# Altium PCB IOT_Speaker-PCB-v1.3.PcbDoc (part 2 of 3)
Units mm, origin at the board's own origin, x right, y up, seen from the top; angles counter-clockwise.
Board outline 61.96 x 67.79 mm, 2 copper layers (Top Layer, Bottom Layer), stack 1.57 mm thick; 111 components, 61 nets, 362 pads, 148 vias.
Unrouted connection lines stored in the file: 20.
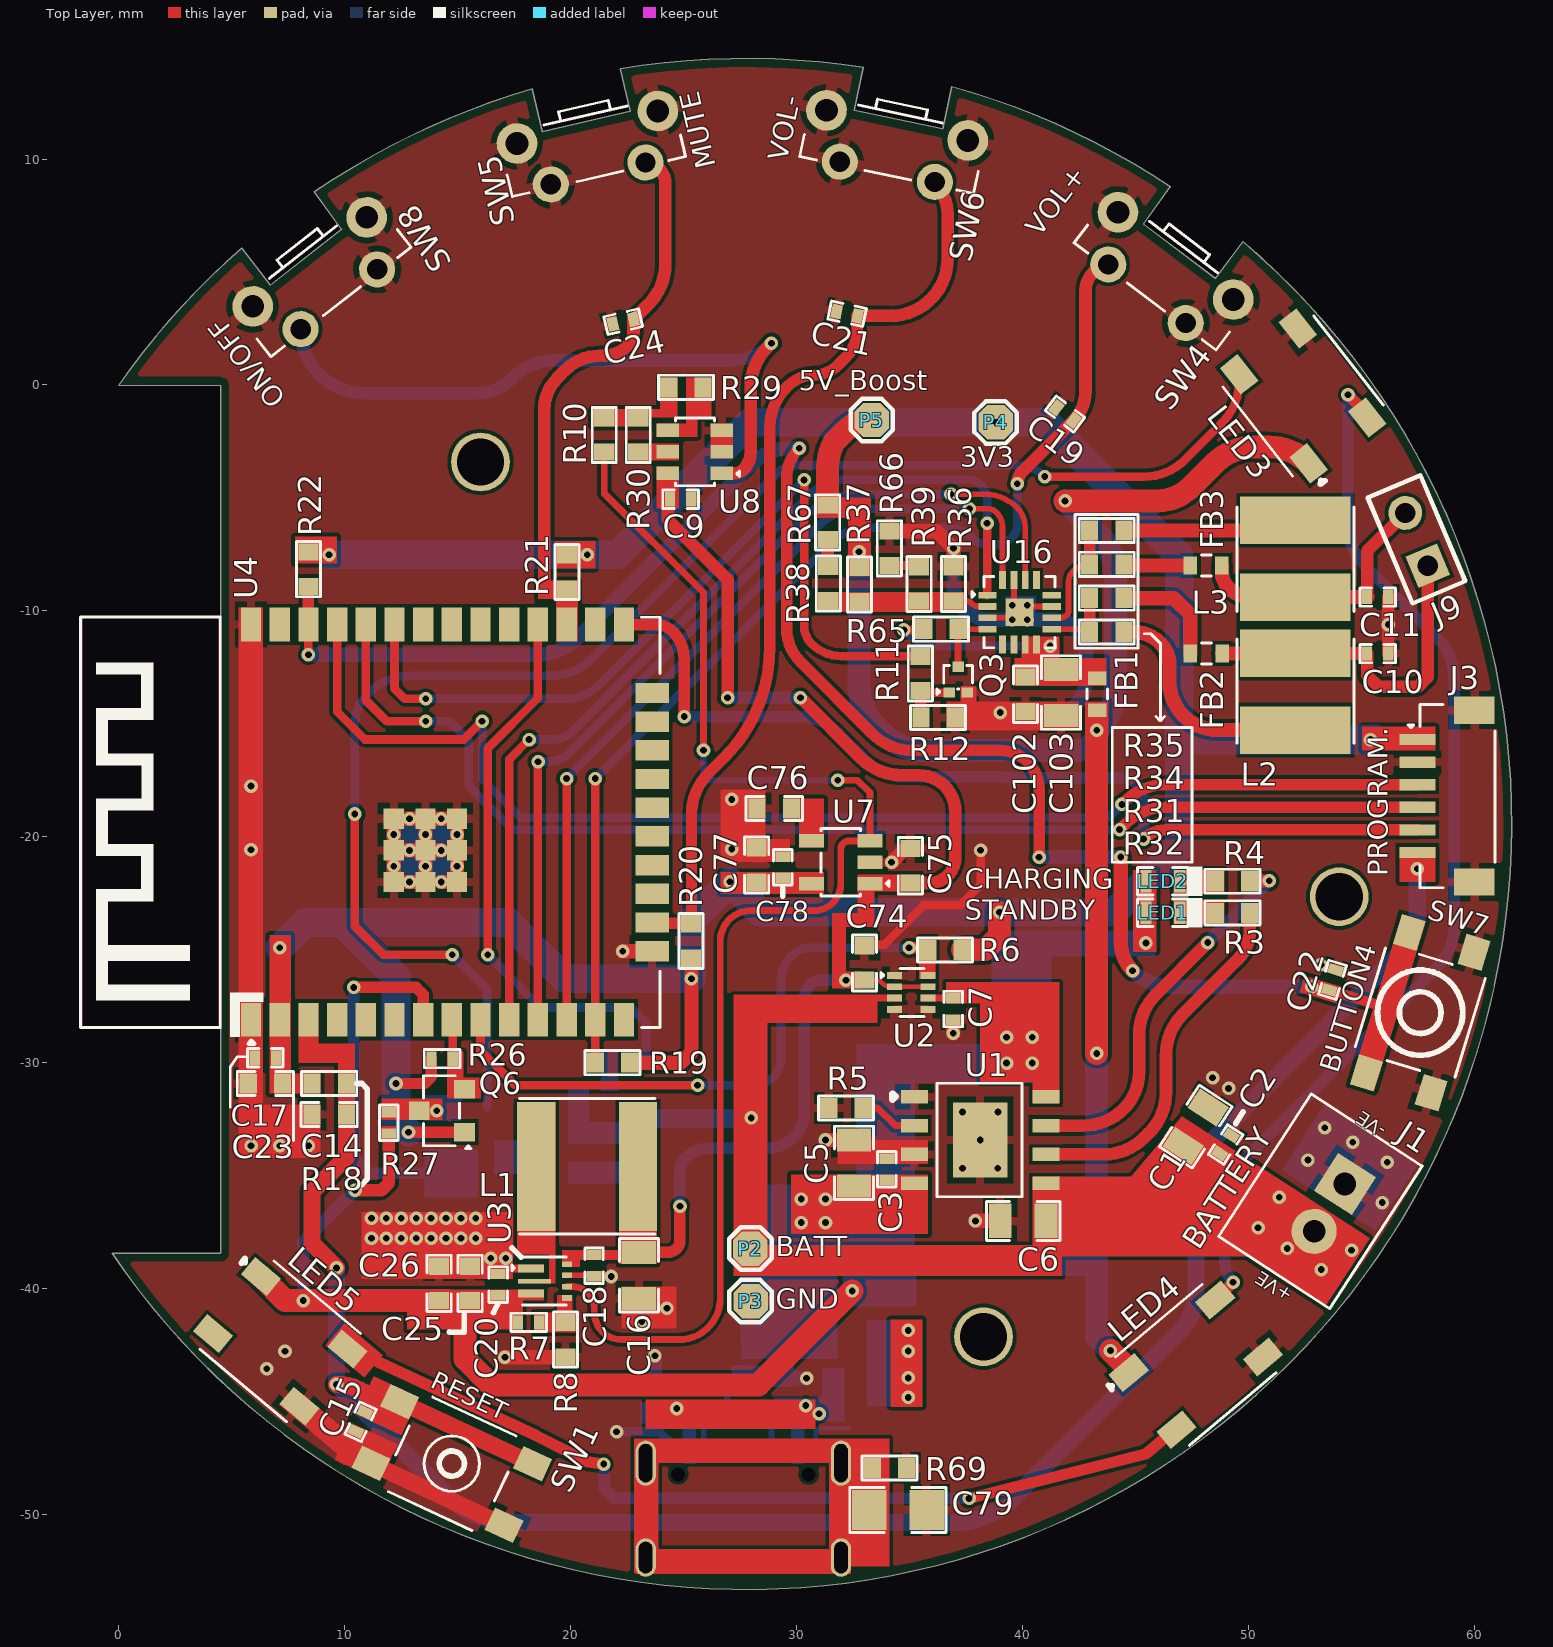
[diagram p0: Top Layer view]

## Part data (continued)
R3: library part RC0603FR-07220RL, "RES SMD 220 OHM 1% 1/10W 0603", Case Code (Imperial)=0603, Case Code (Metric)=1608, LCSC Part Number=C107696, Manufacturer=Yageo, Max Operating Temperature=155°C, Max Power Dissipation=100mW, Min Operating Temperature=-55°C, Package Quantity=1, Resistance=220R, Supplier Part Number 1=311-220HRCT-ND, Temperature Coefficient=100ppm/°C, Tolerance=1%, Voltage Rating=50V, Case/Package=0603, ComponentLink1Description=http://www.yageo.com/documents/recent/PYu-RC_Group_51_RoHS_L_10.pdf?src-supplier=Digi-Key, ComponentLink1URL=http://www.yageo.com/documents/recent/PYu-RC_Group_51_RoHS_L_10.pdf?src-supplier=Digi-Key, ComponentLink2Description=http://www.farnell.com/datasheets/1868787.pdf?src-supplier=Element14, ComponentLink2URL=http://www.farnell.com/datasheets/1868787.pdf?src-supplier=Element14, Composition="Thick Film", Depth=0.8mm, Features="Moisture Resistant", Height=0.022inch, Item Type=Resistor, Lead Free="Lead Free", Length=1.6mm, Manufacturer Part Number=RC0603FR-07220RL, Military Standard=Not, Number of Pins=2, Number of Terminations=2, Packaging="Tape and Reel", Power Rating=100mW, Pricing 1="1=0.1, 10=0.023, 100=0.0094, 1000=0.00421, 2500=0.00366 (USD)", REACH SVHC="No SVHC", Stock 1=5843995, Supplier 1=Digi-Key, Termination=SMD/SMT, Voltage Rating (DC)=50V, Width=0.031inch
R4: library part RC0603JR-07330RL, "RES  SMD 330R 100 mW 0603", Case Code (Imperial)=0603, Case Code (Metric)=1608, LCSC Part Number=C105879, Manufacturer=Yageo, Max Operating Temperature=155°C, Max Power Dissipation=100mW, Min Operating Temperature=-55°C, Package Quantity=5000, Resistance Tolerance=5%, Resistor Type="Thick Film", Supplier Part Number 1=311-330GRCT-ND, Temperature Coefficient=100ppm/°C, Voltage Rating=50V, Case/Package=0603, Category="Chip SMD Resistors", Construction=Rectangular, Depth=0.8mm, Features="Moisture Resistant", Height=0.45mm, Item Type=Resistor, Lead Free="Lead Free", Length=1.6mm, Manufacturer Part Number=RC0603JR-07330RL, Military Standard=Not, Number of Pins=2, Number of Terminations=2, Packaging="Tape and Reel", Power Rating=100mW, Pricing 1="1=0.10000, 10=0.02000, 100=0.00800, 1000=0.00360, 2500=0.00312 (USD)", REACH SVHC="No SVHC", Resistance=330R, RoHS=Yes, RoHS Compliant=Yes, Series=RC, Size Code=0603, Stock 1=1074593, Supplier 1=Digi-Key, Termination=SMD/SMT, Tolerance=5%, Voltage Rating (DC)=50V, Width=0.8mm
R5: library part 0603WAF1201T5E, "Thick Film Resistors 75V 1.2kΩ 0603 Chip Resistor - Surface Mount ROHS", LCSC Part Number=C22765, Manufacturer=UNI-ROYAL, ComponentLink1Description=LCSC, ComponentLink1URL=https://lcsc.com/product-detail/Chip-Resistor-Surface-Mount_UNI-ROYAL-Uniroyal-Elec-0603WAF1201T5E_C22765.html, Footpint=0603, Item Type=Resistor, Manufacturer Part Number=0603WAF1201T5E
R6 R18 R19 R20 R21 R22: library part RC0603FR-0710KL, "RES SMD 10K Ohm 1% 1/10W 0603", Case Code (Imperial)=0603, Case Code (Metric)=1608, LCSC Part Number=C98220, Manufacturer=Yageo, Max Operating Temperature=155°C, Max Power Dissipation=100mW, Min Operating Temperature=-55°C, Resistance=10kR, Resistance Tolerance=1%, Resistor Type="Thick Film", Supplier Part Number 1=311-10.0KHRCT-ND, Temperature Coefficient=100ppm/°C, Voltage Rating=75V, Voltage Rating (DC)=50V, Case/Package=0603, Category="Chip SMD Resistors", ComponentLink1Description=https://datasheet.ciiva.com/7660/38590-7660789.pdf?src-supplier=Element14, ComponentLink1URL=https://datasheet.ciiva.com/7660/38590-7660789.pdf?src-supplier=Element14, ComponentLink2Description=https://datasheet.ciiva.com/7983/443971-7983596.pdf?src-supplier=Element14, ComponentLink2URL=https://datasheet.ciiva.com/7983/443971-7983596.pdf?src-supplier=Element14, ComponentLink3Description=https://datasheet.ciiva.com/22747/443971-22747519.pdf?src-supplier=Element14, ComponentLink3URL=https://datasheet.ciiva.com/22747/443971-22747519.pdf?src-supplier=Element14, ComponentLink4Description=https://datasheet.ciiva.com/46440/1868787-46440891.pdf?src-supplier=Element14, ComponentLink4URL=https://datasheet.ciiva.com/46440/1868787-46440891.pdf?src-supplier=Element14, ComponentLink5Description=https://datasheet.ciiva.com/7746/1738695-7746239.pdf?src-supplier=Element14, ComponentLink5URL=https://datasheet.ciiva.com/7746/1738695-7746239.pdf?src-supplier=Element14, ComponentLink6Description=https://datasheet.ciiva.com/15189/getdatasheetpartid-409289-15189591.pdf?src-supplier=Verical, ComponentLink6URL=https://datasheet.ciiva.com/15189/getdatasheetpartid-409289-15189591.pdf?src-supplier=Verical, Construction=Rectangular, Depth=0.8mm, Features="Moisture Resistant", Height=0.45mm, Item Type=Resistor, Lead Free="Lead Free", Lead Pitch=0.3mm, Length=1.6mm, Manufacturer Part Number=RC0603FR-0710KL, Military Standard=Not, Number of Pins=2, Number of Terminations=2, Packaging="Tape and Reel", Power Rating=100mW, Pricing 1="1=0.10000, 10=0.02400, 100=0.00970, 1000=0.00436, 2500=0.00378 (USD)", REACH SVHC=Unknown, RoHS=Yes, RoHS Compliant=Yes, Series=RC, Size Code=0603, Stock 1=25249139, Supplier 1=Digi-Key, Termination=SMD/SMT, Tolerance=1%, Weight=7.1E-05oz, Width=0.8mm
R7: library part FRC0402F7323TS, "±1% 732kΩ 0402 Chip Resistor - Surface Mount ROHS", LCSC Part Number=C5159692, Manufacturer=FOJAN, Package=0402, ComponentLink1Description=LCSC, ComponentLink1URL=https://www.lcsc.com/product-detail/Chip-span-style-background-color-ff0-Resistor-span-Surface-Mount_FOJAN-FRC0402F7323TS_C5159692.html, Item Type=Resistor, Manufacturer Part Number=FRC0402F7323TS
R8 R66 R67: library part RT0603BRD07100KL, "RES SMD 100K OHM 0.1% 1/10W 0603", Case Code (Imperial)=0603, Case Code (Metric)=1608, LCSC Part Number=C122538, Manufacturer=Yageo, Max Operating Temperature=125°C, Max Power Dissipation=100mW, Min Operating Temperature=-55°C, Package Quantity=5000, Resistance=100kR, Supplier Part Number 1=YAG1235CT-ND, Temperature Coefficient=25ppm/°C, Tolerance=0.1%, Voltage Rating=75V, Case/Package=0603, ComponentLink1Description=http://documents.rs-components.com/techlib://itc_doclist_GB.htm?stockno=6174810&src-supplier=RSComponents, ComponentLink1URL=http://documents.rs-components.com/techlib://itc_doclist_GB.htm?stockno=6174810&src-supplier=RSComponents, Composition="Thin Film", Depth=0.8mm, Features="Moisture Resistant", Height=0.022inch, Item Type=Resistor, Lead Free="Lead Free", Length=1.6mm, Manufacturer Part Number=RT0603BRD07100KL, Military Standard=Not, Mount="Surface Mount", Number of Terminations=2, Packaging="Tape and Reel", Power Rating=100mW, Pricing 1="1=0.39, 10=0.332, 100=0.1298, 1000=0.05435, 2500=0.04982 (USD)", Stock 1=53395, Supplier 1=Digi-Key, Termination=SMD/SMT, Voltage Rating (DC)=75V, Width=0.031inch, Working Voltage=75V
R9 R12 R54: library part RC0603JR-0747KL, "RES 47K OHM 5% 1/10W 0603", Case Code (Imperial)=0603, Case Code (Metric)=1608, LCSC Part Number=C127447, Manufacturer=Yageo, Max Operating Temperature=155°C, Max Power Dissipation=100mW, Min Operating Temperature=-55°C, Package Quantity=5000, Resistance=47kR, Resistance Tolerance=1%, Resistor Type="Thick Film", Temperature Coefficient=100ppm/°C, Tolerance=5%, Voltage Rating=50V, Case/Package=0603, Category="Chip SMD Resistors", ComponentLink1Description=http://www.farnell.com/datasheets/443971.pdf, ComponentLink1URL=http://www.farnell.com/datasheets/443971.pdf, ComponentLink2Description=http://www.mouser.com/catalog/specsheets/RC0603.pdf, ComponentLink2URL=http://www.mouser.com/catalog/specsheets/RC0603.pdf, ComponentLink3Description=https://datasheet.ciiva.com/46395/443971-46395003.pdf?src-supplier=Element14, ComponentLink3URL=https://datasheet.ciiva.com/46395/443971-46395003.pdf?src-supplier=Element14, ComponentLink4Description=https://datasheet.ciiva.com/12558/rc0603-272842-12558744.pdf?src-supplier=Mouser, ComponentLink4URL=https://datasheet.ciiva.com/12558/rc0603-272842-12558744.pdf?src-supplier=Mouser, Composition="Thick Film", Construction=Rectangular, Depth=0.8mm, Features="Moisture Resistant", Height=0.45mm, Lead Free="Lead Free", Length=1.6mm, Manufacturer Part Number=RC0603JR-0747KL, Military Standard=Not, Number of Pins=2, Number of Terminations=2, Packaging="Tape and Reel", Power Rating=100mW, Pricing 1="5000=0.0025, 10000=0.0022, 25000=0.0019, 1=0.0011, 6000=0.001 (USD)", Pricing 2="1=0.10000, 10=0.02300, 100=0.00930, 1000=0.00417, 2500=0.00362 (USD)", REACH SVHC="No SVHC", RoHS=Yes, RoHS Compliant=Yes, Series=RC, Size Code=0603, Stock 1=599135, Stock 2=1087850, Supplier 1=Arrow, Supplier 2=Digi-Key, Supplier Part Number 1=RC0603JR-0747KL, Supplier Part Number 2=311-30.0KHRCT-ND, Termination=SMD/SMT, Voltage Rating (DC)=50V, Width=0.8mm
R10 R11 R56: library part RC0603JR-074K7L, "RES SMD 4.7K OHM 5% 1/10W 0603", Case Code (Imperial)=0603, Case Code (Metric)=1608, LCSC Part Number=C105428, Manufacturer=Yageo, Max Operating Temperature=155°C, Min Operating Temperature=-55°C, Power Rating=100mW, Resistance=4.7kR, Supplier Part Number 1=311-4.7KGRCT-ND, Temperature Coefficient=100ppm/°C, Tolerance=5%, Voltage Rating=50V, Case/Package=0603, ComponentLink1Description=http://www.farnell.com/datasheets/443971.pdf?src-supplier=Element14, ComponentLink1URL=http://www.farnell.com/datasheets/443971.pdf?src-supplier=Element14, Composition="Thick Film", Depth=0.8mm, Lead Free="Lead Free", Length=1.6mm, Manufacturer Part Number=RC0603JR-074K7L, Military Standard=Not, Number of Pins=2, Packaging="Tape and Reel", Pricing 1="1=0.1, 10=0.02, 100=0.0081, 1000=0.00362, 2500=0.00314 (USD)", REACH SVHC="No SVHC", Stock 1=19706643, Supplier 1=Digi-Key, Termination=SMD/SMT, Voltage Rating (DC)=50V, Width=0.8mm
  R10 R56: Item Type=Resistor
R26 R27: library part RC0402FR-0710KL, "RES 10K OHM 1% 1/16W 0402", Case Code (Imperial)=0402, Case Code (Metric)=1005, LCSC Part Number=C60490, Manufacturer=Yageo, Max Operating Temperature=155°C, Max Power Dissipation=63mW, Min Operating Temperature=-55°C, Power Rating=62.5mW, Resistance=10kR, Resistance Tolerance=1%, Resistor Type="Thick Film", Supplier Part Number 1=603-RC0402FR-0710KL, Temperature Coefficient=100ppm/°C, Voltage Rating=50V, Case/Package=0402, Category="Chip SMD Resistors", ComponentLink1Description=https://datasheet.ciiva.com/7660/38568-7660787.pdf?src-supplier=Element14, ComponentLink1URL=https://datasheet.ciiva.com/7660/38568-7660787.pdf?src-supplier=Element14, ComponentLink2Description=https://datasheet.ciiva.com/7849/1686128-7849814.pdf?src-supplier=Element14, ComponentLink2URL=https://datasheet.ciiva.com/7849/1686128-7849814.pdf?src-supplier=Element14, ComponentLink3Description=https://datasheet.ciiva.com/7983/1018594-7983486.pdf?src-supplier=Element14, ComponentLink3URL=https://datasheet.ciiva.com/7983/1018594-7983486.pdf?src-supplier=Element14, ComponentLink4Description=https://datasheet.ciiva.com/22747/1018594-22747512.pdf?src-supplier=Element14, ComponentLink4URL=https://datasheet.ciiva.com/22747/1018594-22747512.pdf?src-supplier=Element14, ComponentLink5Description=https://datasheet.ciiva.com/12667/pyu-rc0402-51-rohs-l-6-r-12667067.pdf?src-supplier=Mouser, ComponentLink5URL=https://datasheet.ciiva.com/12667/pyu-rc0402-51-rohs-l-6-r-12667067.pdf?src-supplier=Mouser, ComponentLink6Description=https://datasheet.ciiva.com/7849/1784430-7849813.pdf?src-supplier=Element14, ComponentLink6URL=https://datasheet.ciiva.com/7849/1784430-7849813.pdf?src-supplier=Element14, ComponentLink7Description=https://datasheet.ciiva.com/7849/1784430-7849815.pdf?src-supplier=Element14, ComponentLink7URL=https://datasheet.ciiva.com/7849/1784430-7849815.pdf?src-supplier=Element14, Construction=Rectangular, Depth=0.5mm, Features="Moisture Resistant", Height=0.32mm, Item Type=Resistor, Lead Free="Lead Free", Lead Pitch=0.2mm, Length=1mm, Manufacturer Part Number=RC0402FR-0710KL, Military Standard=Not, Number of Pins=2, Number of Terminations=2, Packaging="Tape and Reel", Pricing 1="1=0.10000, 10=0.01400, 50=0.01400, 100=0.00500, 1000=0.00300, 10000=0.00200 (USD)", REACH SVHC="No SVHC", RoHS=Yes, RoHS Compliant=Yes, Series=RC, Stock 1=18648329, Supplier 1=Mouser, Termination=SMD/SMT, Tolerance=1%, Voltage Rating (DC)=50V, Width=0.5mm, Working Voltage=50V
R28 R55: library part RC0603FR-071KL, "RES SMD 1K OHM 1% 1/10W 0603", Case Code (Imperial)=0603, Case Code (Metric)=1608, LCSC Part Number=C22548, Manufacturer=Yageo, Max Operating Temperature=155°C, Min Operating Temperature=-55°C, Power Rating=100mW, Resistance=1kR, Supplier Part Number 1=311-1.00KHRDKR-ND, Temperature Coefficient=100ppm/°C, Tolerance=1%, Voltage Rating=50V, Case/Package=0603, ComponentLink1Description=https://www.verical.com/server-webapp/html/getDatasheet?partID=409289&src-supplier=Verical, ComponentLink1URL=https://www.verical.com/server-webapp/html/getDatasheet?partID=409289&src-supplier=Verical, ComponentLink2Description=http://documents.rs-components.com/techlib://itc_doclist_GB.htm?stockno=5048928&src-supplier=RSComponents, ComponentLink2URL=http://documents.rs-components.com/techlib://itc_doclist_GB.htm?stockno=5048928&src-supplier=RSComponents, ComponentLink3Description=http://www.yageo.com/documents/recent/PYu-RC0603_51_RoHS_L_4.pdf?src-supplier=Avnet+Europe, ComponentLink3URL=http://www.yageo.com/documents/recent/PYu-RC0603_51_RoHS_L_4.pdf?src-supplier=Avnet+Europe, ComponentLink4Description=http://www.farnell.com/datasheets/2167052.pdf?src-supplier=Element14, ComponentLink4URL=http://www.farnell.com/datasheets/2167052.pdf?src-supplier=Element14, ComponentLink5Description=http://www.farnell.com/datasheets/1868787.pdf?src-supplier=Element14, ComponentLink5URL=http://www.farnell.com/datasheets/1868787.pdf?src-supplier=Element14, ComponentLink6Description=http://www.yageo.com/documents/recent/PYu-RC_Group_51_RoHS_L_2.pdf?src-supplier=Avnet, ComponentLink6URL=http://www.yageo.com/documents/recent/PYu-RC_Group_51_RoHS_L_2.pdf?src-supplier=Avnet, ComponentLink7Description=https://www.verical.com/server-webapp/html/getDatasheet?partID=404327&src-supplier=Verical, ComponentLink7URL=https://www.verical.com/server-webapp/html/getDatasheet?partID=404327&src-supplier=Verical, ComponentLink8Description=http://www.farnell.com/datasheets/443971.pdf?src-supplier=Element14, ComponentLink8URL=http://www.farnell.com/datasheets/443971.pdf?src-supplier=Element14, Composition="Thick Film", Contact Plating=Tin,Matte, Depth=0.8mm, Height=0.45mm, Item Type=Resistor, Lead Free="Lead Free", Length=1.6mm, Manufacturer Part Number=RC0603FR-071KL, Military Standard=Not, Packaging="Tape and Reel", Pricing 1="1=0.1, 10=0.023, 100=0.0094, 1000=0.0042, 2500=0.0037 (USD)", Radiation Hardening=No, REACH SVHC="No SVHC", Stock 1=21472395, Supplier 1=Digi-Key, Termination=SMD/SMT
R29 R30 R31 R32 R34 R35 R36 R37 R38 R39: library part RC0603FR-070RL, "RES SMD 0R, 1%, 0.1W, 0603", LCSC Part Number=C100044, Manufacturer=Yageo, Package=0603, ComponentLink9Description=LCSC, ComponentLink9URL=https://www.lcsc.com/product-detail/Chip-Resistor-Surface-Mount_YAGEO-RC0603FR-070RL_C100044.html, Item Type=Resistor, Manufacturer Part Number=RC0603FR-070RL
R65 R69: library part RC0603FR-071ML, "RES SMD 1M OHM 1% 1/10W 0603", Case Code (Imperial)=0603, Case Code (Metric)=1608, LCSC Part Number=C105578, Manufacturer=Yageo, Max Operating Temperature=155°C, Min Operating Temperature=-55°C, Package Quantity=5000, Power Rating=100mW, Resistance=1MR, Supplier Part Number 1=311-1.00MHRDKR-ND, Temperature Coefficient=100ppm/°C, Tolerance=1%, Voltage Rating=50V, Case/Package=0603, ComponentLink1Description=http://www.farnell.com/datasheets/2167052.pdf?src-supplier=Mouser, ComponentLink1URL=http://www.farnell.com/datasheets/2167052.pdf?src-supplier=Mouser, ComponentLink2Description=http://www.farnell.com/datasheets/2167052.pdf?src-supplier=Element14, ComponentLink2URL=http://www.farnell.com/datasheets/2167052.pdf?src-supplier=Element14, ComponentLink3Description=http://documents.rs-components.com/techlib://itc_doclist_GB.htm?stockno=5048956&src-supplier=RSComponents, ComponentLink3URL=http://documents.rs-components.com/techlib://itc_doclist_GB.htm?stockno=5048956&src-supplier=RSComponents, Composition="Thick Film", Depth=0.8mm, Height=0.45mm, Lead Free="Lead Free", Length=1.6mm, Manufacturer Part Number=RC0603FR-071ML, Military Standard=Not, Number of Pins=2, Packaging="Tape and Reel", Pricing 1="1=0.1, 10=0.023, 100=0.0094, 1000=0.00421, 2500=0.00366 (USD)", REACH SVHC="No SVHC", Stock 1=3824601, Supplier 1=Digi-Key, Termination=SMD/SMT, Voltage Rating (DC)=50V, Width=0.8mm
  R69: Item Type=Resistor
SW1: "No NO 50mA 4.5mm 100000 260gf 12V -30℃~+85℃ 4.5mm 4.3mm Black Round Button Brick nogging SPST SMD Tactile Switches ROHS", LCSC Part Number=C381037, Manufacturer="XKB Connectivity", Package=Custom, ComponentLink1Description=LCSC, ComponentLink1URL=https://www.lcsc.com/product-detail/Tactile-Switches_XKB-Connectivity-TS-1109S-C-B_C381037.html, Item Type=Switch, Manufacturer Part Number=TS-1109S-C-B
SW4 SW5 SW6 SW8: "Plugin-4P,7.7x3.5mm Tactile Switches ROHS", LCSC Part Number=C541963, Manufacturer=Yuandi, Item Type="Tactile Switch", Manufacturer Part Number=TS-1087E-B3D2
SW7: "No NO 50mA 4.5mm 100000 160gf 12V -30℃~+85℃ 4.5mm 8mm Black Round Button Brick nogging SPST SMD Tactile Switches ROHS", LCSC Part Number=C480323, Manufacturer="XKB Connectivity", Package=SMD, ComponentLink1Description=LCSC, ComponentLink1URL=https://www.lcsc.com/product-detail/span-style-background-color-ff0-Tactile-span-Switches_XKB-Connectivity-TS-1109S-B-J_C480323.html, Item Type=Switch, Manufacturer Part Number=TS-1109S-B-J
U1: "ESOP-8 Battery Management ICs ROHS", LCSC Part Number=C16581, Manufacturer=TOPPOWER, Package=ESOP-8, ComponentLink1Description=LCSC, ComponentLink1URL=https://www.lcsc.com/product-detail/Battery-Management-ICs_TOPPOWER-Nanjing-Extension-Microelectronics-TP4056-42-ESOP8_C16581.html, Item Type=Mosfet, Manufacturer Part Number=TP4056-42-ESOP8
U2: "OR Controller N+1 ORing Controller N-Channel 2:1 SOT-583", LCSC Part Number=C3235556, Manufacturer="Texas Instruments", Supplier Part Number 1=595-LM66200DRLR, Category="Integrated Circuits (ICs)", Item Type=IC, Manufacturer Part Number=LM66200DRLR, Pricing 1="1=0.80000, 10=0.70000, 50=0.65800, 100=0.53700, 1000=0.34000, 10000=0.30700 (USD)", RoHS=No, Stock 1=11717, Supplier 1=Mouser
U3: "8-A boost converter with 0.5-V ultra-low input voltage 7-VQFN-HR -40 to 125", LCSC Part Number=C915088, Manufacturer="Texas Instruments", Supplier Part Number 1=296-TPS61022RWURDKR-ND, Category="Voltage Regulators - Switching", ComponentLink1Description=LCSC, ComponentLink1URL=https://www.lcsc.com/product-detail/DC-DC-Converters_Texas-Instruments-TPS61022RWUR_C915088.html, Item Type=IC, Manufacturer Part Number=TPS61022RWUR, Pricing 1="1=1.88000, 10=1.68800, 25=1.59280, 100=1.35690, 250=1.27412, 500=1.11486, 1000=0.92374 (USD)", RoHS=Yes, Supplier 1=Digi-Key
U4: "RF TXRX MODULE BT PCB TRACE SMD", LCSC Part Number=C5361945, Manufacturer="Espressif Systems", Supplier Part Number=1965-ESP32-WROOM-32E-N8R2DKR-ND, Category=Uncategorized, Item Type=Module, Manufacturer Part Number=ESP32-WROOM-32E-N8R2, Pricing="1=2.88 (USD)", RoHS=No, Supplier=Digikey
U7: "SPX3819 Series 3.3 V 500 mA Fixed Output SMT LDO Regulator - SOT-23-5", LCSC Part Number=C9055, Manufacturer=MaxLinear, Supplier Part Number 1=23R9703, Category="Voltage Regulators - Linear", ComponentLink1Description=LCSC, ComponentLink1URL=https://www.lcsc.com/product-detail/Linear-Voltage-Regulators-LDO_MaxLinear-SPX3819M5-L-3-3-TR_C9055.html, Item Type=IC, Manufacturer Part Number=SPX3819M5-L-3-3/TR, RoHS=Yes, RoHS Compliant=Yes, Supplier 1=Newark
U8: "IC CNTRLR ON/OFF W/DEB TSOT23-6", Case/Package=SOT-23-6, LCSC Part Number=C79401, Manufacturer=Maxim, Max Operating Temperature=125°C, Max Power Dissipation=727W, Max Supply Voltage=5.5V, Min Operating Temperature=-40°C, Min Supply Voltage=2.7V, Number of Voltages Monitored=1, Operating Supply Current=7uA, Undervoltage Threshold=1.8V, Category="Interface ICs", ComponentLink1Description=https://datasheet.ciiva.com/4901/max16054-83881-4901086.pdf?src-supplier=Mouser, ComponentLink1URL=https://datasheet.ciiva.com/4901/max16054-83881-4901086.pdf?src-supplier=Mouser, ComponentLink2Description=https://datasheet.ciiva.com/1784/max16054-1784560.pdf?src-supplier=Digi-Key, ComponentLink2URL=https://datasheet.ciiva.com/1784/max16054-1784560.pdf?src-supplier=Digi-Key, ComponentLink3Description=https://datasheet.ciiva.com/14247/max16054-14247770.pdf?src-supplier=Avnet, ComponentLink3URL=https://datasheet.ciiva.com/14247/max16054-14247770.pdf?src-supplier=Avnet, ComponentLink4Description=https://datasheet.ciiva.com/1784/max16054-1784561.pdf?src-supplier=Digi-Key, ComponentLink4URL=https://datasheet.ciiva.com/1784/max16054-1784561.pdf?src-supplier=Digi-Key, ComponentLink5Description=https://datasheet.ciiva.com/1784/max16054-1784562.pdf?src-supplier=Digi-Key, ComponentLink5URL=https://datasheet.ciiva.com/1784/max16054-1784562.pdf?src-supplier=Digi-Key, Contact Plating=Tin,Matte, Height=0.73mm, Item Type=IC, Length=4mm, Manufacturer Part Number=MAX16054AZT+T, Mounting Technology="Surface Mount", Output Type=PUSH-PULL, Package Quantity=1, Packaging="Tape and Reel", Pins=6, Pricing 1="1=2.99700 (USD)", Radiation Hardening=No, RoHS=Yes, RoHS Compliant=Yes, Series=-, Stock 1=3, Supplier 1="Arrow Electronics", Supplier Part Number 1=MAX16054AZT+T, Watchdog Timer=No, Width=4mm
U16: "Audio Amplifier, 1 Func, PQCC16", Case/Package=QCCN, LCSC Part Number=C910544, Manufacturer=Maxim, Max Operating Temperature=85°C, Max Supply Current=3mA, Min Operating Temperature=-40°C, Package Body Material=Plastic, Package Equivalence Code=LCC16,.12SQ,20, Package Shape=Square, Package Style="CHIP CARRIERMeter", Power Supplies=5V, Temperature Grade=INDUSTRIAL, Category="Amplifiers - Audio", Channels=1, ComponentLink1Description=https://datasheet.ciiva.com:443/pdfs/VipMasterIC/IC/MAXM/MAXM-S-A0007997446/MAXM-S-A0007997446-1.pdf?src-supplier=IHS+Markit, ComponentLink1URL=https://datasheet.ciiva.com:443/pdfs/VipMasterIC/IC/MAXM/MAXM-S-A0007997446/MAXM-S-A0007997446-1.pdf?src-supplier=IHS+Markit, ComponentLink2Description=https://datasheet.ciiva.com/29970/max98357a-max98357b-29970280.pdf?src-supplier=Avnet, ComponentLink2URL=https://datasheet.ciiva.com/29970/max98357a-max98357b-29970280.pdf?src-supplier=Avnet, Consumer IC Type="AUDIO AMPLIFIER", Item Type=IC, JESD-30 Code=S-PQCC-N16, Manufacturer Part Number=MAX98357AETE+T, Moisture Sensitivity Level=1, Pins=16, Pricing 1="1=2.83800 (USD)", Qualification Status="Not Qualified", Reach SVHC Compliant=Yes, RoHS=Yes, RoHS Compliant=Yes, Stock 1=2, Supplier 1="Arrow Electronics", Supplier Part Number 1=MAX98357AETE+T, Surface Mount=Yes, Terminal Form="No Lead", Terminal Pitch=0.5mm, Terminal Position=QUAD

## Free pads (board coordinates)
  round 2.6 hole 2.1 unplated mask+0.05: MH(16.009,-3.408) MH(38.278,-42.139) MH(54.026,-22.657)

## Via types
v1: diameter 0.6, hole 0.3, Top Layer to Bottom Layer, tented both sides, 130 vias
v2: diameter 0.6, hole 0.3, Top Layer to Bottom Layer, 18 vias

## Nets (pads, with @x,y where several pads share a name; then routed paths per layer and width w, separated by ;. In a path a pad name is that pad's centre, name@x,y a point inside that pad or via, vN(x,y) a via of type N, cw(c..) or ccw(c..) an arc to the next point about the centre after c; other vN are vias at no path point)
3.3V: C17.2 C23.2 C77.2 C78.2 J3.1 P4.1 Q6.1 R6.1 R18.2 R19.2 R20.2 R21.2 R22.2 R26.1 U4.2 U7.5 | length 129.3
  Top Layer w0.508: v1@12.25,-30.908 v1(12.268,-30.926) 13.541,-30.926 13.839,-30.628 R26.1@13.839,-29.824 ; v1(12.82,-33.082) Q6.1@15.297,-33.082
  Top Layer w0.635: R19.2@22.613,-30.005 24.879,-30.005 25.349,-29.535 v1(25.349,-26.29) R20.2@25.349,-25.403 ; v1@55.491,-15.698 J3.1@57.487,-15.698
  Top Layer w1: R6.1@37.339,-25.012 38.353,-25.012 38.989,-24.376 v1(38.989,-23.343)
  Bottom Layer w0.559: 46.951,-15.714 cw(c46.989,-15.752) 46.989,-15.698
  Bottom Layer w1.27: v1(7.119,-24.919) 8.238,-23.8 9.861,-23.8 ; v1(9.305,-7.52) v1(20.733,-7.52) 22.065,-7.52 27.932,-1.652 v1(38.818,-1.652) 41.051,-1.652 46.951,-7.552 46.951,-15.714 46.951,-20.465 44.073,-23.343 v1(38.989,-23.343) 28.387,-23.343 v1@27.058,-22.014 ; v1(12.82,-33.082) 12.268,-32.53 v1(12.268,-30.926) 12.268,-26.207 9.861,-23.8 ; v1(25.349,-26.29) 19.737,-26.29 17.247,-23.8 9.861,-23.8 ; v1@25.349,-26.239 25.349,-23.706 v1(27.058,-21.998)
  other v1: 55.415,-15.698
5V: C3.2 C5.2 C7.2 C13.2 FB7.2 LED1.1 LED2.1 U1.4 U1.8 U2.6 | length 3
  Bottom Layer w1.016: 36.748,-30.151 38.539,-30.151 ; 39.301,-29.389 39.601,-29.389 v1@40.269,-28.721
  other v1: 30.208,-37.085 31.284,-37.085 30.208,-36.044 31.284,-36.044 39.301,-30.024 40.441,-30.024 39.301,-28.881 40.441,-28.881 45.47,-24.705
5V_BOOST: C20.2 C25.2 C26.2 FB1.1 LED3.1 LED4.1 LED5.1 P5.1 R7.2 R27.1 R37.2 R67.2 U3.3 | length 122.7
  Top Layer w0.559: v1(10.452,-35.652) 11.623,-35.652 11.95,-35.325 R27.1@11.95,-33.139
  Top Layer w0.635: R37.2@32.773,-8.053 R37.2@32.788,-8.068
  Top Layer w1.016: LED5.1@6.29,-39.472 7.358,-40.54 C26.2@14.18,-40.54 ; 14.925,-40.938 14.563,-40.938 14.18,-40.555 C26.2@14.18,-40.54 ; 14.973,-40.909 14.973,-40.966 15.328,-41.32 15.328,-43.125 16.47,-44.267 28.309,-44.267 v1(32.468,-40.108) ; 15.323,-40.938 14.946,-40.938 14.563,-40.555 14.563,-40.54 C26.2@14.18,-40.54 ; R67.2@31.382,-5.319 31.382,-3.642 cw(c33.745,-3.642) 31.667,-2.516 32.138,-2.045 cw(c33.332,-3.238) P5.1@33.332,-1.551 ; v1(41.892,-5.132) 45.983,-5.132 ccw(c45.983,-3.051) 47.454,-4.522 48.488,-3.488 cw(c50.284,-5.284) 50.284,-2.744 50.921,-2.744 cw(c50.921,-5.221) LED3.1@52.672,-3.47 ; v1(43.289,-29.592) v1(43.289,-15.285) ; v1(43.898,-42.749) 44.588,-43.439 cw(c44.299,-43.727) LED4.1@44.707,-43.727
  Bottom Layer w0.559: v1(8.16,-40.54) 8.16,-37.944 v1(10.452,-35.652)
  Bottom Layer w1.016: v1(32.773,-7.386) 32.773,-13.325 ccw(c35.313,-13.325) 33.517,-15.122 33.833,-15.437 ccw(c35.629,-13.641) 35.629,-16.181 42.418,-16.181 ccw(c42.418,-15.285) 43.314,-15.285 ccw(c41.441,-13.374) 44.117,-13.374 44.117,-8.409 ccw(c41.577,-8.409) 43.373,-6.613 v1(41.892,-5.132) ; 37.915,-38.911 43.289,-38.911 ; v1(43.289,-29.592) 43.289,-38.911 ; v1(43.898,-42.749) 43.289,-42.14 43.289,-38.911
AMPLIFIER: R11.2 U4.33 | length 37.4
  Top Layer w0.381: U4.33@12.201,-10.606 12.201,-13.445 12.649,-13.894 v1(13.589,-13.894) ; v1(30.335,-4.204) 30.335,-10.659 ccw(c31.46,-10.659) 30.664,-11.455 ccw(c31.993,-10.126) 31.993,-12.005 R11.2@35.481,-12.005
  Bottom Layer w0.381: v1(13.589,-13.894) 19.821,-13.894 ccw(c19.821,-11.905) 21.218,-13.32 ccw(c19.821,-11.905) 21.226,-13.312 v1(30.335,-4.204)
BAT_ADC: C83.2 D2.2 R9.1 R54.2 U4.7 | length 17.6
  Top Layer w0.508: v1(10.396,-26.671) 13.155,-26.671 13.484,-27 13.484,-28.093 U4.7@13.471,-28.106
  Bottom Layer w0.508: v1(10.396,-26.671) 10.396,-34.221 11.071,-34.896 14.714,-34.896 D2.2@13.9,-34.082
BAT_STAT: R56.1 U4.28 | length 25.5
  Top Layer w0.381: v1(16.332,-25.222) 16.332,-16.078 18.551,-13.86 U4.28@18.551,-10.606
  Bottom Layer w0.381: v1(16.332,-25.222) 18.669,-27.559 22.657,-27.559 23.343,-28.245 ; R56.1@23.292,-29.845 23.343,-29.794 23.343,-28.245 ; 23.368,-28.27 23.343,-28.245
BATT: C1.2 C2.2 C6.2 J1.2 P2.1 Q1.2 R55.1 U1.5 U2.3
  other v1: 53.23,-39.167 54.576,-38.312 51.732,-38.227 50.436,-37.312 51.376,-35.966 27.998,-32.45
BCLK: U4.12 U16.16 | length 37.8
  Top Layer w0.254: v1(37.657,-5.475) 38.453,-5.475 cw(c38.453,-6.037) 38.85,-5.64 cw(c38.186,-6.304) 39.125,-6.304 U16.16@39.125,-8.634
  Top Layer w0.381: U4.12@19.821,-28.106 v1(19.821,-17.425)
  Bottom Layer w0.381: v1(19.821,-17.425) 30.408,-6.837 30.408,-6.803 ; 30.302,-6.909 30.408,-6.803 ; v1(37.657,-5.475) 32.788,-5.475 ccw(c32.788,-8.015) 31.006,-6.205 ccw(c32.788,-8.015) 30.992,-6.219 30.408,-6.803
BUTTON_1: C19.1 R19.1 SW4.2 U4.13 | length 49.7
  Top Layer w0.381: R19.1@21.09,-29.976 21.09,-28.107 v1(21.091,-17.425) v1@21.091,-17.399
  Top Layer w0.559: v1(39.776,-4.369) cw(c40.536,-4.369) 39.999,-3.832 C19.1@42.262,-1.568 ccw(c40.975,-0.281) C19.1@42.262,-1.568 ccw(c40.975,-0.281) 42.795,-0.281 42.795,4.176 cw(c43.905,4.176) SW4.2@43.905,5.285
  Bottom Layer w0.381: v1(21.091,-17.425) 31.523,-6.993 cw(c33.133,-8.603) 33.133,-6.326 36.745,-6.326 cw(c36.745,-7.713) 37.726,-6.732 ccw(c38.581,-5.877) 38.581,-7.086 38.7,-7.086 ccw(c38.7,-5.877) 39.555,-6.732 ccw(c39.02,-6.197) 39.776,-6.197 v1(39.776,-4.369)
BUTTON_2: C21.1 R20.1 SW6.1 U4.16 | length 40.7
  Top Layer w0.508: U4.16@23.611,-23.796 23.64,-23.825 25.295,-23.825 R20.1@25.324,-23.854 ccw(c25.258,-23.788) 25.351,-23.788 25.351,-19 cw(c27.891,-19) 26.095,-17.204 26.804,-16.496 ccw(c21.947,-11.64) 28.815,-11.64 28.815,-1.899 cw(c31.355,-1.899) 29.559,-0.103 29.628,-0.034 cw(c30.751,-1.158) 30.751,0.431 ccw(c30.751,1.958) 30.764,0.431 ccw(c30.751,1.958) 31.667,0.736 ccw(c30.751,1.958) 31.831,0.878 32.197,1.245 ccw(c30.986,2.456) 32.699,2.456 C21.1@32.699,3.059
  Top Layer w0.559: C21.1@32.699,3.059 34.154,3.059 ccw(c34.154,5.599) 36.694,5.599 36.694,7.546 ccw(c34.748,7.546) SW6.1@36.124,8.922
BUTTON_3: C24.1 R21.1 SW5.1 U4.27 | length 22.8
  Top Layer w0.559: 18.828,-9.145 18.828,-1.108 cw(c20.848,-1.108) 19.42,0.32 19.755,0.655 cw(c21.298,-0.887) 21.298,1.294 21.469,1.294 ccw(c21.469,2.768) 22.511,1.726 ccw(c21.857,2.38) 22.782,2.38 C24.1@22.782,2.908 23.449,3.575 ccw(c21.653,5.371) 24.193,5.371 24.193,8.942 ccw(c23.337,8.942) 23.337,9.798 SW5.1@23.449,9.686 ; R21.1@19.535,-9.044 R21.1@19.844,-9.044
  Top Layer w0.635: U4.27@19.821,-10.606 19.807,-10.592 U4.27@19.833,-10.567